# Altium PCB PCB_A1.PcbDoc (part 2 of 2)
Units mil, origin at the board's own origin, x right, y up, seen from the top; angles counter-clockwise.
Board outline 2000 x 2550 mil, 4 copper layers (Top Layer, GND, 3V3, Bottom Layer), stack 61.818 mil thick; 74 components, 52 nets, 287 pads, 163 vias.
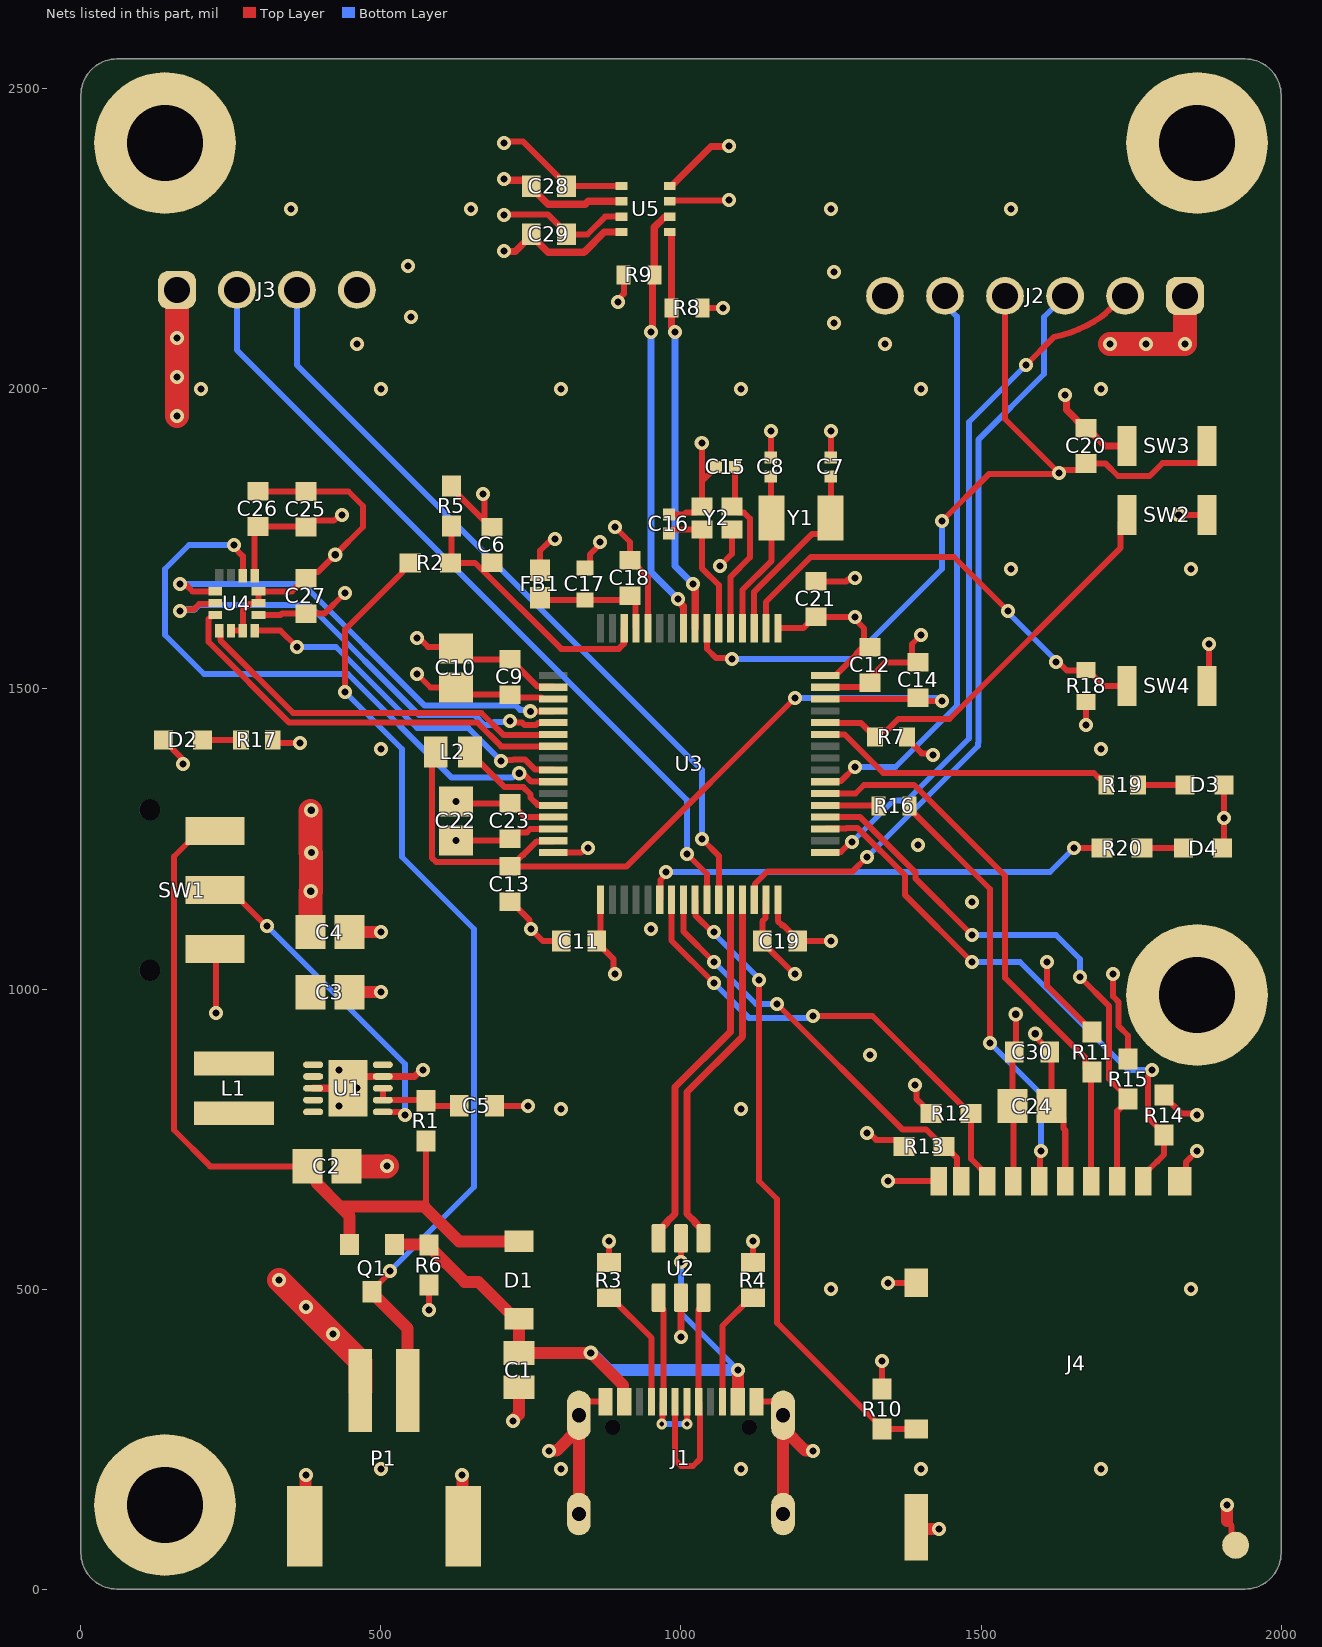
[diagram p4: the nets of this part, all layers, seen from the top]

## Part data (continued)
U1: library part CMP-0345-00003-1, "Buck-Boost Voltage Converter with 1.8 to 5.5 V Input and 3.3 V Output, -40 to 85 degC, 10-Pin SON (DRC), Green (RoHS & no Sb/Br)", Dynamic Voltage Scaling=TRUE, Manufacturer="Texas Instruments", Switching Frequency(Max)(kHz)=1500, ComponentLink1Description=Datasheet, ComponentLink1URL=http://www.ti.com/general/docs/lit/getliterature.tsp?genericPartNumber=TPS63001&fileType=pdf, ComponentLink2Description="Package Specification", ComponentLink2URL=http://www.ti.com/litv/pdf/mpds117k, DatasheetVersion=SLVS520B, Eco-Plan="Green (RoHS & no Sb/Br)", Iout(Max)(A)=1.2, Iq(Typ)(mA)=0.03, Mounting Technology="Surface Mount", PackageDescription="10-Pin Plastic Small Outline No-Lead, 3 x 3 x 1 mm Body, 0.5 mm Pitch, Exposed Pad", PackageReference=DRC10-2400X1650TP, PackageVersion="revL, Sep-2011", PartNumber=TPS63001DRCRG4, Preset Vout(V)=3.3, Regulated Outputs(#)=1, SubFamily="Buck-Boost Regulator", Synchronous Rectification=TRUE, Topology=Buck-Boost, Vin(Max)(V)=5.5, Vin(Min)(V)=1.8, Vout(Max)(V)=3.3, Vout(Min)(V)=3.3
U2: "17V Clamp 5A (8/20Âµs) Ipp Tvs Diode Surface Mount SOT-23-6", Package="SOT-23-6 STMicroelectronics", Availability="In Stock", Check_prices=https://www.snapeda.com/parts/USBLC6-2SC6/STMicroelectronics/view-part/?ref=eda, MF=STMicroelectronics, MP=USBLC6-2SC6, Price=None, Purchase-URL=https://pricing.snapeda.com/search/part/USBLC6-2SC6/?ref=eda, SnapEDA_Link=https://www.snapeda.com/parts/USBLC6-2SC6/STMicroelectronics/view-part/?ref=snap
U3: library part CMP-00355-135308217-1, "ARM Microcontrollers - MCU Ultra-low-power FPU Arm Cortex-M33 MCU TrustZone, 160", ComponentLink1Description="Manufacturer's Website", ComponentLink1URL=http://www.st.com, ComponentLink2Description="Datasheet URL", ComponentLink2URL=https://www.st.com/resource/en/datasheet/stm32u5a5aj.pdf, HelpURL=https://www.st.com/resource/en/datasheet/stm32u5a5aj.pdf, Lifecycle Status=Production
U4: library part CMP-12177-000010-1, "INEMO INERTIAL MODULE: 3D ACCELE", Manufacturer=STMicroelectronics, Max Supply Voltage=3.6V, Min Supply Voltage=1.62V, Operating Supply Current=0.55mA, Package=LGA-14L-DM00249496, Temperature="-40°C to +85°C", Temperature Range High=+85°C, Temperature Range Low=-40°C, Accel Range=2/4/8/16g, Accel Sensitivity=0.061/0.122/0.244/0.488mV/g, Automotive=No, Category=IC, ComponentLink2Description=Datasheet, ComponentLink2URL=https://www.st.com/resource/en/datasheet/lsm6dsox.pdf, Device Class L1=Sensors, Device Class L2="Motion Sensors", Device Class L3="Inertial Measurement Units (IMUs)", Digikey Description="INEMO INERTIAL MODULE: 3D ACCELE", Footprint Url=https://www.st.com/content/ccc/resource/technical/document/technical_note/73/17/9c/16/dd/96/4a/01/CD00134799.pdf/files/CD00134799.pdf/jcr:content/translations/en.CD00134799.pdf, Gyro Range=125/250/500/1000/2000°/s, Gyro Sensitivity=4.375/8.75/17.5/35/70LSB/°/s, Height=0.86mm, Lead Free=Yes, Manufacturer Part Number=LSM6DSOXTR, Mouser Description="LSM6DSOX: 3.6 V 3 Axis Accelerometer Gyroscope iNEMO Inertial Module - LGA-14L", Octopart=https://octopart.com/lsm6dsoxtr-stmicroelectronics-98102600, RoHS=TRUE, Sensor Output=I2C,SPI,Other, Sensor Type=Temperature,Accelerometer,Gyroscope
U5: library part CMP-2000-05073-3, "SENSOR PRESSURE HUMIDITY TEMP", Case/Package=LGA, Max Operating Temperature=85°C, Min Operating Temperature=-40°C, Accuracy=3%, Lead Free="Lead Free", Mount="Surface Mount", Number of Pins=8, Output Type=SPI, Packaging="Cut Tape", Response Time=1s, Sensor Type=Temperature
Y1: library part CMP-27762-014373-1, "Crystal 32.768kHz ±20ppm (Tol) 7pF FUND 70kΩ 2-Pin CSMD T/R", Case/Package=CSMD, ESR (Equivalent Series Resistance)=70kR, Frequency=32.768kHz, Frequency Stability=20ppm, Insulation Resistance=500MR, Load Capacitance=7pF, Max Operating Temperature=85°C, Min Operating Temperature=-40°C, Operating Frequency="32.768 kHz", Package Quantity=3000, Depth=1.5mm, Frequency Tolerance=20ppm, Height=0.9mm, Lead Free="Lead Free", Length=3.2mm, Mount="Surface Mount", Number of Pins=2, Packaging="Tape and Reel", Radiation Hardening=No, Series=ABS07, Series Resistance=70kR, Termination=SMD/SMT, Tolerance=20ppm, Width=1.5mm
Y2: library part CMP-27762-006513-1, "Crystal 16MHz ±10ppm 8pF SMD-4 2mm x 1.6mm", RoHS Compliant=Yes

## Free pads (board coordinates)
  round 236 / inner round 60 / far side round 236 hole 126: 1(140,140) 1(140,2410) 1(1860,990) 1(1860,2410)

## Via types
v1: diameter 24, hole 12, Top Layer to Bottom Layer, tented both sides, 161 vias
v2: diameter 18, hole 8, Top Layer to Bottom Layer, tented both sides, 2 vias

## Nets (pads, with @x,y where several pads share a name; then routed paths per layer and width w, separated by ;. In a path a pad name is that pad's centre, name@x,y a point inside that pad or via, vN(x,y) a via of type N, cw(c..) or ccw(c..) an arc to the next point about the centre after c; other vN are vias at no path point)
3V3: C3.1 C4.1 C9.1 C10.1 C11.1 C12.1 C19.1 C21.1 C22.1 C23.1 C24.1 C25.2 C26.1 C27.1 C28.1 C29.1 C30.1 FB1.1 J2.1 J3.1 J4.4 R8.2 R9.1 R10.2 R11.2 R12.2 R13.2 R14.2 R15.2 R17.1 SW2.1 SW4.1 U1.1 U1.10 U3.1 U3.19 U3.29 U3.33 U3.48 U3.64 U4.5 U4.8 U5.2 U5.6 U5.8 | length 3645.2
  Top Layer w10: U4.8@289.53,1688.9 289.53,1765 C26.1@295,1770.47 374.53,1770.47 C25.2@375,1770 385.75,1780.75 421.96,1780.75 431.21,1790 v1(435,1790) ; U4.5@295.93,1623.44 332.85,1623.44 334.88,1625.47 C27.1@375,1625.47 405.47,1625.47 v1(440,1660) ; R17.1@320,1415 325,1410 v1(365,1410) ; v1(560,1525) 582.51,1502.49 C10.1@625,1502.49 637.02,1490.47 C9.1@715,1490.47 719.8,1485.68 767.28,1485.68 769.68,1483.27 U3.19@787.4,1483.27 ; v1(625,1312.51) 627.98,1309.53 C23.1@715,1309.53 ; v1(705,2290) 706,2291 778.21,2291 809.53,2259.68 C29.1@809.53,2257.72 844.27,2257.72 873.76,2287.2 U5.6@900.71,2287.2 ; v1(705,2410) 707.21,2412.21 737,2412.21 809.53,2339.68 C28.1@809.53,2337.72 810.2,2338.39 U5.8@900.71,2338.39 ; C23.1@716.97,1309.53 740.08,1286.42 U3.29@787.4,1286.42 ; FB1.1@765,1697.68 765,1730.52 781.81,1747.32 787.32,1747.32 v1(790,1750) ; U3.33@866.14,1148.62 866.14,1086.61 C11.1@859.53,1080 859.53,1078.03 887.32,1050.24 887.32,1027.68 v1(890,1025) ; v1(895,2145) 895,2148.79 904.7,2158.49 904.7,2189.7 R9.1@904.41,2190 ; U5.2@981.42,2312.8 982.52,2313.9 1078.9,2313.9 v1(1080,2315) ; R8.2@1035.59,2135 v1(1070,2135) ; U3.48@1161.42,1148.62 1161.42,1113.11 1168.49,1106.04 1170.46,1106.04 1194.53,1081.97 C19.1@1194.53,1080 v1(1250,1080) ; U3.1@1161.42,1601.38 1203.94,1601.38 1223.03,1620.47 C21.1@1225,1620.47 1225.47,1620 v1(1290,1620) 1290,1616.21 1305,1601.21 1305,1569.53 1303.03,1569.53 1292.28,1558.78 1292.28,1557.05 1257.87,1522.64 U3.64@1240.16,1522.64 ; v1(1310,760) 1313.79,760 1325.32,748.46 1360.79,748.46 R13.2@1371.54,737.72 ; R10.2@1335,333.46 v1(1335,380) ; v1(1390,840) 1392.68,837.32 1392.68,816.57 1403.82,805.43 1403.82,803.46 1414.57,792.72 R12.2@1416.54,792.72 ; v1(1590.49,925.49) 1593.17,922.81 1593.17,918.33 1614.53,896.97 C30.1@1614.53,895 ; v1(1610,1045) 1610,1005.43 1685,930.43 R11.2@1685,928.46 ; C30.1@1617.51,881.02 C24.1@1617.51,805 1637.21,785.3 1637.21,767.79 1640.39,764.61 J4.4@1640.39,679.84 ; v1(1720,1025) 1720,987.63 1729.47,978.16 1729.47,938.1 1745,922.57 R15.2@1745,883.46 ; R14.2@1805,823.46 1805,821.5 1833.82,792.68 1857.32,792.68 v1(1860,790) ; v1(1829.68,1790) SW2.1@1876.93,1790 ; SW4.1@1876.93,1505 1880,1508.07 v1(1880,1575)
  Top Layer w40: v1(160,1955) v1(160,2020) v1(160,2085) J3.1@160,2165 ; v1@382.38,1296.56 382.38,1227.52 383.08,1226.82 v1(383.08,1162.89) 382.49,1162.29 C4.1@382.49,1095 ; v1(1715,2075) v1(1840,2075) J2.1@1840,2155
  other v1: 384.07,1227.41 383.84,1298.02 1775,2075
BME_SCL: R8.1 U3.8 U5.4 | length 678.9
  Top Layer w12: U5.4@981.42,2261.61 983.52,2261.61 984.41,2260.72 R8.1@984.41,2135 984.41,2103.84 990,2098.25 v1(990,2095) ; v1(1020,1675) 1020,1671.75 1023.62,1668.13 U3.8@1023.62,1601.38
  Bottom Layer w12: v1(990,2095) 990,1705 v1(1020,1675)
BME_SDA: R9.2 U3.9 U5.3 | length 725.9
  Top Layer w12: v1(950,2095) 952.3,2097.3 952.3,2186.71 R9.2@955.59,2190 955.59,2269.49 972.42,2286.31 980.53,2286.31 U5.3@981.42,2287.2 ; v1(995,1650) 995,1646.75 1003.94,1637.82 U3.9@1003.94,1601.38
  Bottom Layer w12: v1(950,2095) 950,1695 v1(995,1650)
BTN: R18.1 SW4.2 U3.2 | length 765.8
  Top Layer w10: U3.2@1141.73,1601.38 1141.73,1645.28 1216.45,1720 1455,1720 v1(1545,1630) ; v1(1625,1545) 1628.79,1545 1642.97,1530.82 1674.18,1530.82 R18.1@1675,1531.64 ; R18.1@1678.02,1531.64 1704.66,1505 SW4.2@1743.07,1505
  Bottom Layer w10: v1(1545,1630) 1545,1627.5 1625,1547.5 v1(1625,1545)
ENB_REG: SW1.2 U1.6 | length 560.9
  Top Layer w10: SW1.2@223.27,1165 248.86,1165 308.86,1105 v1(310,1105) ; U1.6@503.07,795.16 503.27,794.96 531.25,794.96 536.21,790 v1(540,790)
  Bottom Layer w10: v1(310,1105) 540,875 v1(540,790)
GND: C1.2 C2.2 C3.2 C4.2 C5.2 C6.2 C7.2 C8.2 C9.2 C10.2 C11.2 C12.2 C13.2 C14.2 C15.2 C16.2 C17.2 C18.2 C19.2 C20.2 C21.2 C22.2 C23.2 C24.2 C25.1 C26.2 C27.2 C28.2 C29.2 C30.2 D2.2 D3.1 D4.1 J1.A1_B12 J1.B1_A12 J1.SH1 J1.SH2 J1.SH3 J1.SH4 J2.6 J3.4 J4.6 J4.9 J4.11 J4.12 J4.13 J4.14 P1.1 P1.MP1 P1.MP2 pad.1 R3.2 R4.2 R5.2 R6.2 R7.2 R18.2 SW1.3 SW3.2 U1.3 U1.9 U1.11 U2.2 U3.12 U3.18 U3.30 U3.32 U3.47 U3.63 U4.2 U4.3 U4.6 U4.7 U5.1 U5.5 U5.7 Y2.2 Y2.4 | length 5674.8
  Top Layer w10: D2.2@137.52,1415 167.32,1385.2 167.32,1377.68 v1(170,1375) ; SW1.3@223.27,1066.57 225,1064.84 v1(225,960) ; U4.2@250.16,1597.36 U4.3@269.84,1597.36 269.84,1631.13 280.05,1641.33 294.13,1641.33 U4.6@295.93,1643.13 U4.7@295.93,1662.81 351.32,1662.81 373.03,1684.53 C27.2@375,1684.53 385.75,1695.28 395.28,1695.28 v1(423.66,1723.66) 470,1770 470,1805 445.94,1829.06 C25.1@375,1829.06 374.53,1829.53 C26.2@295,1829.53 ; C3.2@447.51,994.53 C3.2@447.98,995 ; v1(460,835) 460,841.82 464.69,846.5 U1.11@464.69,854.21 ; v1(560,1585) 563.79,1585 578.79,1570 622.51,1570 642.98,1549.53 C9.2@715,1549.53 ; v1(580,465) R6.2@580,506.54 ; R5.2@617.28,1838.46 628.03,1827.72 628.03,1824.53 C6.2@683.03,1769.53 ; v1(625,1247.49) 712.02,1247.49 C23.2@715,1250.47 725.75,1261.22 743.27,1261.22 748.78,1266.73 U3.30@787.4,1266.73 ; v1(670,1825) 672.28,1822.72 672.28,1780.28 C6.2@683.03,1769.53 ; C6.2@685,1769.53 C6.2@683.03,1769.53 ; C5.2@689.53,805.32 689.84,805 v1(745,805) ; C13.2@715,1145.47 716.97,1145.47 747.32,1115.12 747.32,1102.68 v1(750,1100) 750,1099.72 769.72,1080 C11.2@800.47,1080 ; C9.2@716.97,1549.53 727.72,1538.78 727.72,1537.24 761.1,1503.86 786.5,1503.86 U3.18@787.4,1502.95 ; v1(780,230) v1@782.68,232.68 ; U3.32@787.4,1227.36 833.57,1227.36 841.21,1235 v1(845,1235) ; J1.SH1@829.92,298.64 843.49,312.2 J1.A1_B12@874.02,312.2 ; C17.2@840,1701.57 840.5,1701.57 848.29,1709.37 848.29,1724.5 865,1741.21 v1(865,1745) ; R3.2@880,544.53 v1(880,579.96) ; v1(890,1770) 915,1745 C18.2@915,1714.53 ; C18.2@913.03,1714.53 916.97,1714.53 944.88,1686.61 U3.12@944.88,1601.38 ; C16.2@980,1790.75 1005.24,1790.75 1008.43,1793.94 1024.65,1793.94 Y2.2@1034.9,1804.19 1034.9,1846.4 ; v1(1034.9,1909.9) 1034.9,1846.4 ; C15.2@1058.5,1870 1034.9,1846.4 ; v1(1065,1705) 1085.1,1725.1 Y2.4@1085.1,1765.81 ; R4.2@1120,544.53 v1(1120,579.96) ; J1.B1_A12@1125.98,312.2 1156.51,312.2 1170.08,298.64 J1.SH2@1170.08,289.57 ; U3.47@1141.73,1148.62 1140.83,1147.72 1140.83,1118.07 1135.47,1112.72 1135.47,1078.03 1188.5,1025 v1(1190,1025) ; C8.2@1149.68,1885.75 1149.84,1885.91 1149.84,1929.84 v1(1150,1930) ; v1@1217.32,232.68 v1(1220,230) ; C21.2@1225,1679.53 1275.74,1679.53 1278.53,1682.32 1287.32,1682.32 v1(1290,1685) ; U3.63@1240.16,1502.95 1302.52,1502.95 C12.2@1305,1500.47 ; C7.2@1249.68,1885.75 1249.84,1885.91 1249.84,1929.84 v1(1250,1930) ; C12.2@1305,1510.47 1306.97,1510.47 1341.02,1544.53 1385,1544.53 1385,1575 v1(1400,1590) ; v1(1345,510) 1391.81,510 J4.12@1392.36,510.55 ; v1(1345,680) 1429.61,680 J4.9@1429.76,679.84 ; R7.2@1376.64,1420 1376.64,1416.98 1400.94,1392.68 1417.32,1392.68 v1(1420,1390) ; J4.13@1392.36,103.07 J4.13@1395.43,100 ; 1552.49,875.05 C24.2@1552.49,805 1553.78,803.71 J4.6@1553.78,679.84 J4.6@1553.78,670 ; v1(1557.99,957.99) 1557.99,907.48 C30.2@1565,900.47 ; v1(1675,1440) R18.2@1675,1478.36 ; J4.11@1831.34,679.84 1841.39,689.89 1841.39,711.39 v1(1860,730) ; D4.1@1902.48,1235 1905,1237.52 v1(1905,1285) D3.1@1905,1340 ; 1910,113 1917.7,105.3 1917.7,79.7 J4.14@1924.41,72.99
  Top Layer w12: U1.3@386.93,834.53 U1.11@445,834.53 ; U1.11@464.69,854.21 U1.9@503.07,854.21 555.97,854.21 566.75,865 v1(570,865) ; v1(705,2230) 705.97,2229.03 723.75,2229.03 C29.2@750.47,2255.75 ; v1(705,2350) 707.3,2347.7 740.72,2347.7 750.47,2337.96 C28.2@750.47,2337.72 ; C29.2@750.47,2257.72 C29.2@750.47,2255.75 ; C28.2@750.47,2335.75 778.22,2308 840.44,2308 845.24,2312.8 U5.7@900.71,2312.8 ; U5.5@900.71,2261.61 872.21,2261.61 838.6,2228 778.22,2228 C29.2@750.47,2255.75 ; U5.1@981.42,2338.39 984.37,2338.39 1050,2404.02 1079.02,2404.02 v1(1080,2405) ; v1(1000,420) U2.2@1000,485.59 ; v1(1640,1990) 1642.3,1987.7 1642.3,1965.26 1673.03,1934.53 C20.2@1675,1934.53 ; C20.2@1676.97,1934.53 1706.5,1905 SW3.2@1743.07,1905
  Top Layer w20: P1.MP1@373.11,104.45 374.23,105.57 374.23,189.23 v1(375,190) ; C4.2@447.51,1095 v1(500,1095) ; C3.2@447.98,995 v1(500,995) ; v1(635,190) 635.77,189.23 635.77,105.57 P1.MP2@636.89,104.45 ; v1(720,280) 720,281.08 730,291.08 C1.2@730,336.41 ; v1(780,230) 780.77,230.77 792.77,230.77 829.92,267.91 J1.SH1@829.92,289.57 J1.SH3@829.92,125 ; J1.SH4@1170.08,125 J1.SH2@1170.08,267.91 ; J1.SH2@1170.08,289.57 J1.SH2@1170.08,267.91 ; v1(1220,230) 1219.23,230.77 1207.23,230.77 J1.SH2@1170.08,267.91 ; J4.13@1395.43,100 v1(1430,100) ; 1910,113 v1(1910,140)
  Top Layer w40: v1(330,515) v1(375,470) v1(420,425) ; v1(420,425) 465.63,379.41 P1.1@465.63,330.83 ; C2.2@442.51,704.53 509.53,704.53 v1(510,705)
  other v1: 500,200 800,200 1100,200 1400,200 1700,200 1250,500 1850,500 800,800 1100,800 430,805 430,865 1315,890 950,1100 1485,1145 1395,1240 500,1400 1700,1400 1550,1700 1850,1700 200,2000 500,2000 800,2000 1100,2000 1400,2000 1700,2000 460,2075 1340,2075 1255,2110 550,2120 1255,2195 545,2205 350,2300 650,2300 1250,2300 1550,2300
IMU_CS: U3.20 U4.12 | length 774.8
  Top Layer w10: v1(165,1675) 167.68,1672.32 176.47,1672.32 185.97,1662.81 U4.12@224.07,1662.81 ; v1(749.09,1462.68) 786.5,1462.68 U3.20@787.4,1463.58
  Bottom Layer w10: v1(165,1675) 370,1675 572.74,1472.26 725.09,1472.26 732,1465.36 746.41,1465.36 v1(749.09,1462.68)
IMU_INT1: U3.25 U4.4 | length 596.6
  Top Layer w10: U4.4@289.53,1597.36 332.64,1597.36 v1(360,1570) ; v1(700,1380) 701.36,1381.36 719.59,1381.36 720.85,1382.62 739.9,1382.62 756.46,1366.06 786.5,1366.06 U3.25@787.4,1365.16
  Bottom Layer w10: v1(360,1570) 425,1570 560,1435 645.62,1435 700,1380.62 v1(700,1380)
IMU_INT2: U3.26 U4.9 | length 1053.3
  Top Layer w10: v1(255,1740) 255,1736.21 269.84,1721.37 U4.9@269.84,1688.9 ; v1(730.38,1359.62) 733.06,1356.94 739.23,1356.94 750.7,1345.47 U3.26@787.4,1345.47
  Bottom Layer w10: v1(255,1740) 180,1740 140,1700 140,1590 205,1525 445,1525 617.38,1352.62 719.59,1352.62 726.59,1359.62 v1(730.38,1359.62)
IMU_MISO: U3.22 U4.1 | length 637.3
  Top Layer w10: U4.1@230.47,1597.36 232.27,1595.57 232.27,1581.49 353.75,1460 667.47,1460 703.8,1423.68 786.87,1423.68 U3.22@787.4,1424.21
IMU_MOSI: U3.23 U4.14 | length 699.2
  Top Layer w10: U4.14@224.07,1623.44 219.65,1623.44 212.58,1616.38 212.58,1578.54 347.13,1444 660.85,1444 700.32,1404.53 U3.23@787.4,1404.53
IMU_SCK: U3.21 U4.13 | length 781.3
  Top Layer w10: v1(165,1630) 167.68,1632.68 188.11,1632.68 197,1641.56 222.51,1641.56 U4.13@224.07,1643.13 ; v1(715,1446.68) 717.68,1444 735.24,1444 739.56,1439.68 757.78,1439.68 759.22,1441.12 760.06,1441.12 761.93,1442.99 786.5,1442.99 U3.21@787.4,1443.9
  Bottom Layer w10: v1(165,1630) 167.68,1632.68 189.68,1632.68 197,1640 380,1640 563.74,1456.26 656.36,1456.26 672.63,1440 683,1440 688,1445 713.32,1445 v1(715,1446.68)
LED_ERROR: R19.1 U3.59 | length 504.9
  Top Layer w10: U3.59@1240.16,1424.21 1272.71,1424.21 1336.93,1360 1688.36,1360 1697.37,1350.99 1700.39,1350.99 1708.36,1343.02 R19.1@1708.36,1340
LED_STATUS: R20.1 U3.38 | length 793.8
  Top Layer w10: U3.38@964.57,1148.62 965.47,1149.53 965.47,1181.68 975,1191.21 v1(975,1195) ; v1(1655,1235) R20.1@1701.54,1235
  Bottom Layer w10: v1(975,1195) 1615,1195 v1(1655,1235)
MCU_RX: J3.3 U3.43 | length 1307.6
  Top Layer w10: v1(1035,1250) 1062.99,1222.01 U3.43@1062.99,1148.62
  Bottom Layer w10: J3.3@360,2165 360,2039.72 1035,1364.72 v1(1035,1250)
MCU_TX: J3.2 U3.42 | length 1340.8
  Top Layer w10: v1(1010,1225) 1043.31,1191.69 U3.42@1043.31,1148.62
  Bottom Layer w10: J3.2@260,2165 260,2064.72 1010,1314.72 v1(1010,1225)
MCU_VDDA: C17.1 C18.1 FB1.2 U3.13 | length 206.2
  Top Layer w10: FB1.2@765,1652.32 768.89,1648.43 C17.1@840,1648.43 920.59,1648.43 924.29,1644.72 924.29,1602.28 U3.13@925.2,1601.38
NetC5_1: C5.1 R1.2 U1.7 U1.8 | length 151
  Top Layer w10: U1.8@503.07,834.53 U1.7@503.07,814.84 573.94,814.84 R1.2@575,813.78 583.46,805.32 C5.1@630.47,805.32
NetD2_1: D2.1 R17.2 | length 64.2
  Top Layer w10: D2.1@202.48,1415 R17.2@266.72,1415
NetD3_2: D3.2 R19.2 | length 78.4
  Top Layer w10: R19.2@1761.64,1340 D3.2@1840.04,1340
NetD4_2: D4.2 R20.2 | length 69.1
  Top Layer w10: R20.2@1768.46,1235 D4.2@1837.52,1235
NetJ4_5: J4.5 R16.1 | length 717.2
  Top Layer w10: R16.1@1380.59,1305 1380.59,1301.06 1515,1166.65 v1(1515,910) ; J4.5@1597.09,679.84 1598.54,681.3 1598.54,728.54 v1(1600,730)
  Bottom Layer w10: v1(1515,910) 1600,825 v1(1600,730)
NetL1_1: L1.1 U1.4
NetL1_2: L1.2 U1.2
NRST: C20.1 J2.4 SW3.1 U3.7 | length 1428.7
  Top Layer w10: U3.7@1043.31,1601.38 1043.31,1566.69 1058,1552 1083,1552 v1(1085,1550) ; v1(1435,1780) 1513,1858 1628,1858 v1(1630,1860) ; J2.4@1540,2155 1540,1950 v1(1630,1860) ; SW3.1@1876.93,1905 1876.93,1887.28 1866.18,1876.54 1802.47,1876.54 1780.94,1855 1728.3,1855 1707.83,1875.47 C20.1@1675,1875.47 1664.25,1864.72 1638.51,1864.72 1633.79,1860 v1(1630,1860)
  Bottom Layer w10: v1(1085,1550) 1285,1550 1435,1700 v1(1435,1780)
OSC32_IN: C7.1 U3.3 Y1.1 | length 314
  Top Layer w10: U3.3@1122.05,1601.38 1122.05,1662.05 1166.28,1706.28 1218.1,1758.1 1232.24,1758.1 1248.9,1774.76 Y1.1@1248.9,1785 1249.68,1785.79 C7.1@1249.68,1854.25
OSC32_OUT: C8.1 U3.4 Y1.2 | length 273.1
  Top Layer w10: U3.4@1102.36,1601.38 1102.36,1664.99 1150.47,1713.1 Y1.2@1150.47,1785 1149.68,1785.79 C8.1@1149.68,1854.25
OSC_IN: C15.1 U3.5 Y2.1 | length 302.1
  Top Layer w10: U3.5@1082.68,1601.38 1082.68,1687.03 1115,1719.36 1115,1783.94 1105.01,1793.94 1095.35,1793.94 Y2.1@1085.1,1804.19 1090,1809.09 C15.1@1090,1870
OSC_OUT: C16.1 U3.6 Y2.3 | length 233.7
  Top Layer w10: C16.1@980,1759.25 986.56,1765.81 Y2.3@1034.9,1765.81 1034.9,1701.37 1062.99,1673.28 U3.6@1062.99,1601.38
PH3_BOOT0: R7.1 SW2.2 U3.60 | length 695.5
  Top Layer w10: U3.60@1240.16,1443.9 1241.06,1442.99 1300.37,1442.99 1312.37,1430.99 1315.39,1430.99 1323.36,1423.02 R7.1@1323.36,1420 1323.36,1422.73 1331.32,1430.7 1342.83,1430.7 1362.13,1450 1447.53,1450 1732.32,1734.8 1732.32,1779.25 SW2.2@1743.07,1790
SD_CD: J4.10 R10.1 U3.41 | length 1070.3
  Top Layer w10: U3.41@1023.62,1148.62 1024.53,1147.72 1024.53,1122.32 1051.85,1095 v1(1055,1095) ; v1(1130,1015) 1130,680 1160,650 1160,443.5 1335,268.5 R10.1@1335,266.54 1392.28,266.54 J4.10@1392.36,266.46
  Bottom Layer w10: v1(1055,1095) 1055,1092.5 1130,1017.5 v1(1130,1015)
SD_CK: R16.2 U3.53 | length 89.7
  Top Layer w10: U3.53@1240.16,1306.1 1328.31,1306.1 R16.2@1329.41,1305
SD_CMD: J4.3 R11.1 U3.54 | length 935.8
  Top Layer w10: U3.54@1240.16,1325.79 1290.79,1325.79 1305,1340 1388.71,1340 1540,1188.71 1540,1018.55 1634.83,923.72 1674.25,884.3 1674.25,867.28 R11.1@1680,861.54 ; J4.3@1683.7,679.84 1683.7,860.24 R11.1@1685,861.54
SD_D0: J4.7 R12.1 U3.39 | length 812.9
  Top Layer w10: U3.39@984.25,1148.62 984.25,1080.75 v1(1055,1010) ; v1(1220,955) 1319.21,955 1481.5,792.72 R12.1@1483.46,792.72 1483.46,716.69 1510.47,689.68 J4.7@1510.47,679.84
  Bottom Layer w10: v1(1055,1010) 1113,952 1213.21,952 1216.21,955 v1(1220,955)
SD_D1: J4.8 R13.1 U3.40 | length 706.4
  Top Layer w10: U3.40@1003.94,1148.62 1003.94,1096.06 v1(1055,1045) ; v1(1160,975) 1369.03,765.97 1408.24,765.97 1436.5,737.72 R13.1@1438.46,737.72 1440.43,737.72 1459.68,718.46 1459.68,687.32 J4.8@1467.17,679.84
  Bottom Layer w10: v1(1055,1045) 1125,975 v1(1160,975)
SD_D2: J4.1 R14.1 U3.51 | length 945.1
  Top Layer w10: U3.51@1240.16,1266.73 1241.06,1267.64 1275.11,1267.64 1275.47,1268 1294.53,1268 1373.44,1189.08 1373.44,1156.56 v1(1485,1045) ; J4.1@1770.32,679.84 1770.32,689.68 1793.24,712.61 1793.79,712.61 1805,723.82 R14.1@1805,756.54 1805,758.5 1778.25,785.25 1778.25,854.46 1785,861.21 v1(1785,865)
  Bottom Layer w10: v1(1485,1045) 1565,1045 1745,865 v1(1785,865)
SD_D3: J4.2 R15.1 U3.52 | length 939.5
  Top Layer w10: U3.52@1240.16,1286.42 1298.74,1286.42 1390.53,1194.63 1390.53,1184.47 v1(1485,1090) ; v1(1665,1020) 1713.47,971.53 1713.47,850.04 1745,818.5 R15.1@1745,816.54 1745,814.57 1727.01,796.57 J4.2@1727.01,679.84
  Bottom Layer w10: v1(1485,1090) 1625,1090 1665,1050 v1(1665,1020)
SWCLK: J2.2 U3.49 | length 1186.9
  Top Layer w10: U3.49@1240.16,1227.36 1241.06,1228.27 1266.46,1228.27 1283.19,1245 v1(1285,1245) ; v1(1575,2040) 1619.62,2084.62 1621.74,2086.74 ccw(c1580.73,2291.91) 1700,2120 ccw(c1647.64,2195.47) 1720.7,2139.8 1723.98,2144.11 cw(c1731.09,2137.07) 1724.02,2144.14 1726.95,2147.07 1732.07,2147.07 J2.2@1740,2155
  Bottom Layer w10: v1(1285,1245) 1354.08,1314.08 1376.6,1314.08 1480,1417.47 1480,1945 v1(1575,2040)
SWDIO: J2.3 U3.46 | length 1304.1
  Top Layer w10: U3.46@1122.05,1148.62 1122.95,1149.53 1122.95,1174.93 1144.15,1196.12 1286.12,1196.12 v1(1310,1220)
  Bottom Layer w10: v1(1310,1220) 1495,1405 1495,1409.85 1496,1410.85 1496,1916 1605,2025 1605,2120 J2.3@1640,2155
SWO: J2.5 U3.55 | length 963.3
  Top Layer w10: U3.55@1240.16,1345.47 1241.06,1346.38 1266.46,1346.38 1290,1369.92 v1(1290,1370)
  Bottom Layer w10: v1(1290,1370) 1357.53,1370 1460,1472.47 1460,2120.66 1440,2140.66 J2.5@1440,2155
USB_CC1: J1.A5 R3.1 | length 204.9
  Top Layer w10: R3.1@880,485.47 883.94,485.47 950.79,418.62 J1.A5@950.79,312.2
USB_CC2: J1.B5 R4.1 | length 196.7
  Top Layer w10: J1.B5@1068.9,312.2 1068.9,438.31 1116.06,485.47 R4.1@1120,485.47
USB_DM: U2.6 U3.44 | length 614
  Top Layer w12: U2.6@962.6,584.41 962.6,596.61 976.39,610.4 976.39,611.5 990,625.11 990,836.53 1082.36,928.89 1082.36,1148.31 U3.44@1082.68,1148.62
USB_DM_NET: J1.A7 J1.B7 U2.1 | length 294.3
  Top Layer w10: U2.1@962.6,485.59 962.6,473.39 970.47,465.51 J1.B7@970.47,312.2 969.57,311.3 969.57,276.53 v2(968.04,275) ; J1.A7@1009.84,312.2 1010,312.05 1010,275.16 v2(1010.16,275)
  Bottom Layer w10: v2(968.04,275) v2(1010.16,275)
USB_DP: U2.4 U3.45 | length 613.8
  Top Layer w12: U2.4@1037.4,584.41 1037.4,596.61 1023.61,610.4 1023.61,611.5 1010,625.11 1010,828.24 1102.36,920.61 U3.45@1102.36,1148.62
USB_DP_NET: J1.A6 J1.B6 U2.3 | length 420.6
  Top Layer w10: J1.A6@990.16,312.2 990.16,214.84 1000,205 1020,205 1031.37,216.37 1031.37,288.89 1030.43,289.83 1030.43,311.3 J1.B6@1029.53,312.2 1029.53,465.51 1037.4,473.39 U2.3@1037.4,485.59
V11_COUT: C13.1 C14.1 L2.1 U3.31 U3.62 | length 1435.4
  Top Layer w10: L2.1@595,1385 585.33,1375.33 585.33,1218.24 591.78,1211.79 707.74,1211.79 C13.1@715,1204.53 C13.1@716.97,1204.53 ; U3.31@787.4,1247.05 786.5,1246.14 759.69,1246.14 737.27,1223.72 736.17,1223.72 C13.1@716.97,1204.53 ; v1(1190,1485) 909.53,1204.53 C13.1@716.97,1204.53 ; U3.62@1240.16,1483.27 C14.1@1387.2,1483.27 ; C14.1@1385,1485.47 C14.1@1387.2,1483.27 ; C14.1@1390,1485.47 1387.8,1483.27 C14.1@1387.2,1483.27 ; v1(1435,1480) 1390.47,1480 C14.1@1387.2,1483.27
  Bottom Layer w10: v1(1190,1485) 1426.21,1485 1431.21,1480 v1(1435,1480)
VBAT: P1.2 Q1.3 R2.1 | length 1607.5
  Top Layer w10: v1(440,1495) 440,1598.82 536.1,1694.92 536.1,1699.25 546.85,1710 R2.1@548.82,1710 ; Q1.3@485,495.63 485,497.6 515,527.6 v1(515,530)
  Top Layer w20: Q1.3@485,493.66 544.37,434.29 P1.2@544.37,330.83
  Bottom Layer w10: v1(440,1495) 535,1400 535,1220 655,1100 655,670 v1(515,530)
VBAT_SENSE: C6.1 R2.2 R5.1 U3.14 | length 440.5
  Top Layer w10: R5.1@617.28,1771.54 617.28,1711.54 R2.2@615.75,1710 657.03,1710 800.28,1566.76 896.29,1566.76 904.61,1575.07 904.61,1600.47 U3.14@905.51,1601.38
VBUS: C1.1 D1.1 J1.A4_B9 J1.B4_A9 Q1.1 R6.1 U2.5 | length 1110.1
  Top Layer w10: v1(1000,545) U2.5@1000,584.41
  Top Layer w20: Q1.1@522.4,574.37 522.85,573.92 579.55,573.92 R6.1@580,573.46 580,571.5 639.38,512.12 662.38,512.12 724,450.5 D1.1@730,450.5 C1.1@730,393.59 v1(849.7,393.59) 903.7,339.6 903.7,314.02 J1.A4_B9@905.51,312.2 ; J1.B4_A9@1094.49,312.2 1094.74,312.46 1094.74,364.74 v1(1095,365)
  Bottom Layer w10: v1(1000,545) 1000,460 v1(1095,365)
  Bottom Layer w20: v1(849.7,393.59) 850.79,393.59 879.38,365 v1(1095,365)
VLX: L2.2 U3.28 | length 170.3
  Top Layer w10: L2.2@658.59,1390 658.59,1384.05 689.79,1352.84 689.79,1352.68 706.2,1336.28 737.27,1336.28 749.18,1324.36 749.18,1318.92 761.1,1307.01 786.5,1307.01 U3.28@787.4,1306.1
VSYS: C2.1 D1.2 Q1.2 R1.1 SW1.1 U1.5 | length 1380.7
  Top Layer w10: SW1.1@223.27,1263.43 197.68,1263.43 155,1220.75 155,765 215.47,704.53 C2.1@377.49,704.53 ; 572.21,637.34 575,640.13 R1.1@575,746.85
  Top Layer w20: C2.1@377.49,704.53 392.19,689.83 392.19,677.5 432.34,637.34 ; Q1.2@447.6,574.37 447.6,622.09 432.34,637.34 ; D1.2@730,579.5 630.06,579.5 572.21,637.34 432.34,637.34
pads on no net: J1. J1.A8 J1.B8 SW1. U3.10 U3.11 U3.15 U3.16 U3.17 U3.24 U3.27 U3.34 U3.35 U3.36 U3.37 U3.50 U3.56 U3.57 U3.58 U3.61 U4.10 U4.11

## Polygon pours and split planes (outlines as drawn)
GND on Top Layer "GND_TOP" (solid, remove dead copper, pour order 5): 0,2550 2000,2550 2000,0 0,0
VSYS on Top Layer "VSYS_L01_P002" (solid, remove dead copper, pour order 2): 372.1,800.66 403.86,800.66 405,799.53 405,669.53 340,669.53 340,762.7
NetL1_1 on Top Layer "POLY_L1" (solid, remove dead copper, pour order 0): 398.22,809.32 365.28,809.32 325.3,769.53 185,769.53 185,820.29 398.22,820.29
NetL1_2 on Top Layer "POLY_L2" (solid, remove dead copper, pour order 1): 398.13,859.73 365.62,859.63 325.29,899.49 185,899.49 185,848.7 398.13,848.7
3V3 on Top Layer "3V3_L01_P003" (solid, remove dead copper, pour order 3): 340,1134.53 405,1134.53 405,954.53 525,954.53 525,868.54 485,868.54 485,919.53 405,919.53 405,869.53 404.02,868.54 371.59,868.54 340,900.12
GND on Bottom Layer "GND_BOTTOM" (solid, remove dead copper, pour order 4): 0,2550 2000,2550 2000,0 0,0
GND on GND (split plane): 1951.64,2528.37 1958.9,2525.36 1965.44,2520.99 1971,2515.44 1975.36,2508.9 1978.37,2501.64 1979.9,2493.93 1979.9,2490 1979.9,60 1979.9,56.07 1978.37,48.36 1975.36,41.1 1971,34.56 1965.44,29.01 1958.9,24.64 1951.64,21.63 1943.93,20.1 56.07,20.1 48.36,21.63 41.1,24.64 34.56,29 29.01,34.56 24.64,41.1 21.63,48.36 20.1,56.07 20.1,60 20.1,2490 20.1,2493.93 21.63,2501.64 24.64,2508.9 29.01,2515.44 34.56,2521 41.1,2525.36 48.36,2528.37 56.07,2529.9 1943.93,2529.9
3V3 on 3V3 (split plane): 1951.64,2528.37 1958.9,2525.36 1965.44,2520.99 1971,2515.44 1975.36,2508.9 1978.37,2501.64 1979.9,2493.93 1979.9,2490 1979.9,60 1979.9,56.07 1978.37,48.36 1975.36,41.1 1971,34.56 1965.44,29.01 1958.9,24.64 1951.64,21.63 1943.93,20.1 56.07,20.1 48.36,21.63 41.1,24.64 34.56,29 29.01,34.56 24.64,41.1 21.63,48.36 20.1,56.07 20.1,60 20.1,2490 20.1,2493.93 21.63,2501.64 24.64,2508.9 29.01,2515.44 34.56,2521 41.1,2525.36 48.36,2528.37 56.07,2529.9 1943.93,2529.9

## Other copper
Top Layer:
  pour cut-out: 670,2540 670,2065 1180,2065 1180,2540
Bottom Layer:
  pour cut-out: 670,2540 670,2065 1180,2065 1180,2540

## Silkscreen, mask and mechanical layers (free items; w line width, h text height)
Top Overlay:
  text "DATALOGGER EPTA  REV A" at 251.77,2479.23 h40
  text "2026-10  CARLOS E. OLIVEIRA" at 1225.84,2479.23 h40
  text "3V3" at 135.04,2234.23 h40
  text "TX" at 242.85,2234.23 h40
  text "RX" at 343.63,2234.23 h40
  text "GND" at 434.19,2234.23 h40
  text "3V3" at 1315.04,2224.23 h40
  text "SWO" at 1414.41,2224.23 h40
  text "NRST" at 1505.26,2224.23 h40
  text "SWDIO" at 1596.25,2224.23 h40
  text "SWCLK" at 1695.75,2224.23 h40
  text "GND" at 1814.19,2224.23 h40
  text "NRST" at 1965.77,1870.26 h40 r90
  text "BOOT0" at 1965.77,1746.91 h40 r90
  text "USER_BT" at 1964.8,1443.01 h40 r90
  text "ON" at 285,1340 h60 r270
  text "OFF" at 285,1060 h60 r270
  text "-" at 355,382.57 h60
  text "+" at 635.06,381.78 h60
  text "BAT 3.0–4.2V" at 320.77,102.87 h40 r90
Mechanical 1:
  lines w10: 60,-5 1940,-5 ; 60,0 cw(c60,60) 0,60 0,2490 cw(c60,2490) 60,2550 1940,2550 cw(c1940,2490) 2000,2490 2000,60 cw(c1940,60) 1940,0

## Text inside footprints (layer, text, board x,y; h text height)
J1: Top 3D Body "PCB EDGE" at 1212.6,26.57 h16